# Altium PCB BOARD_2LAYER.PcbDoc (part 7 of 7)
Units mil, origin at the board's own origin, x right, y up, seen from the top; angles counter-clockwise.
Board outline 9842.52 x 9842.52 mil, 2 copper layers (Top Layer, Bottom Layer), stack 34.252 mil thick; 276 components, 129 nets, 793 pads, 303 vias.
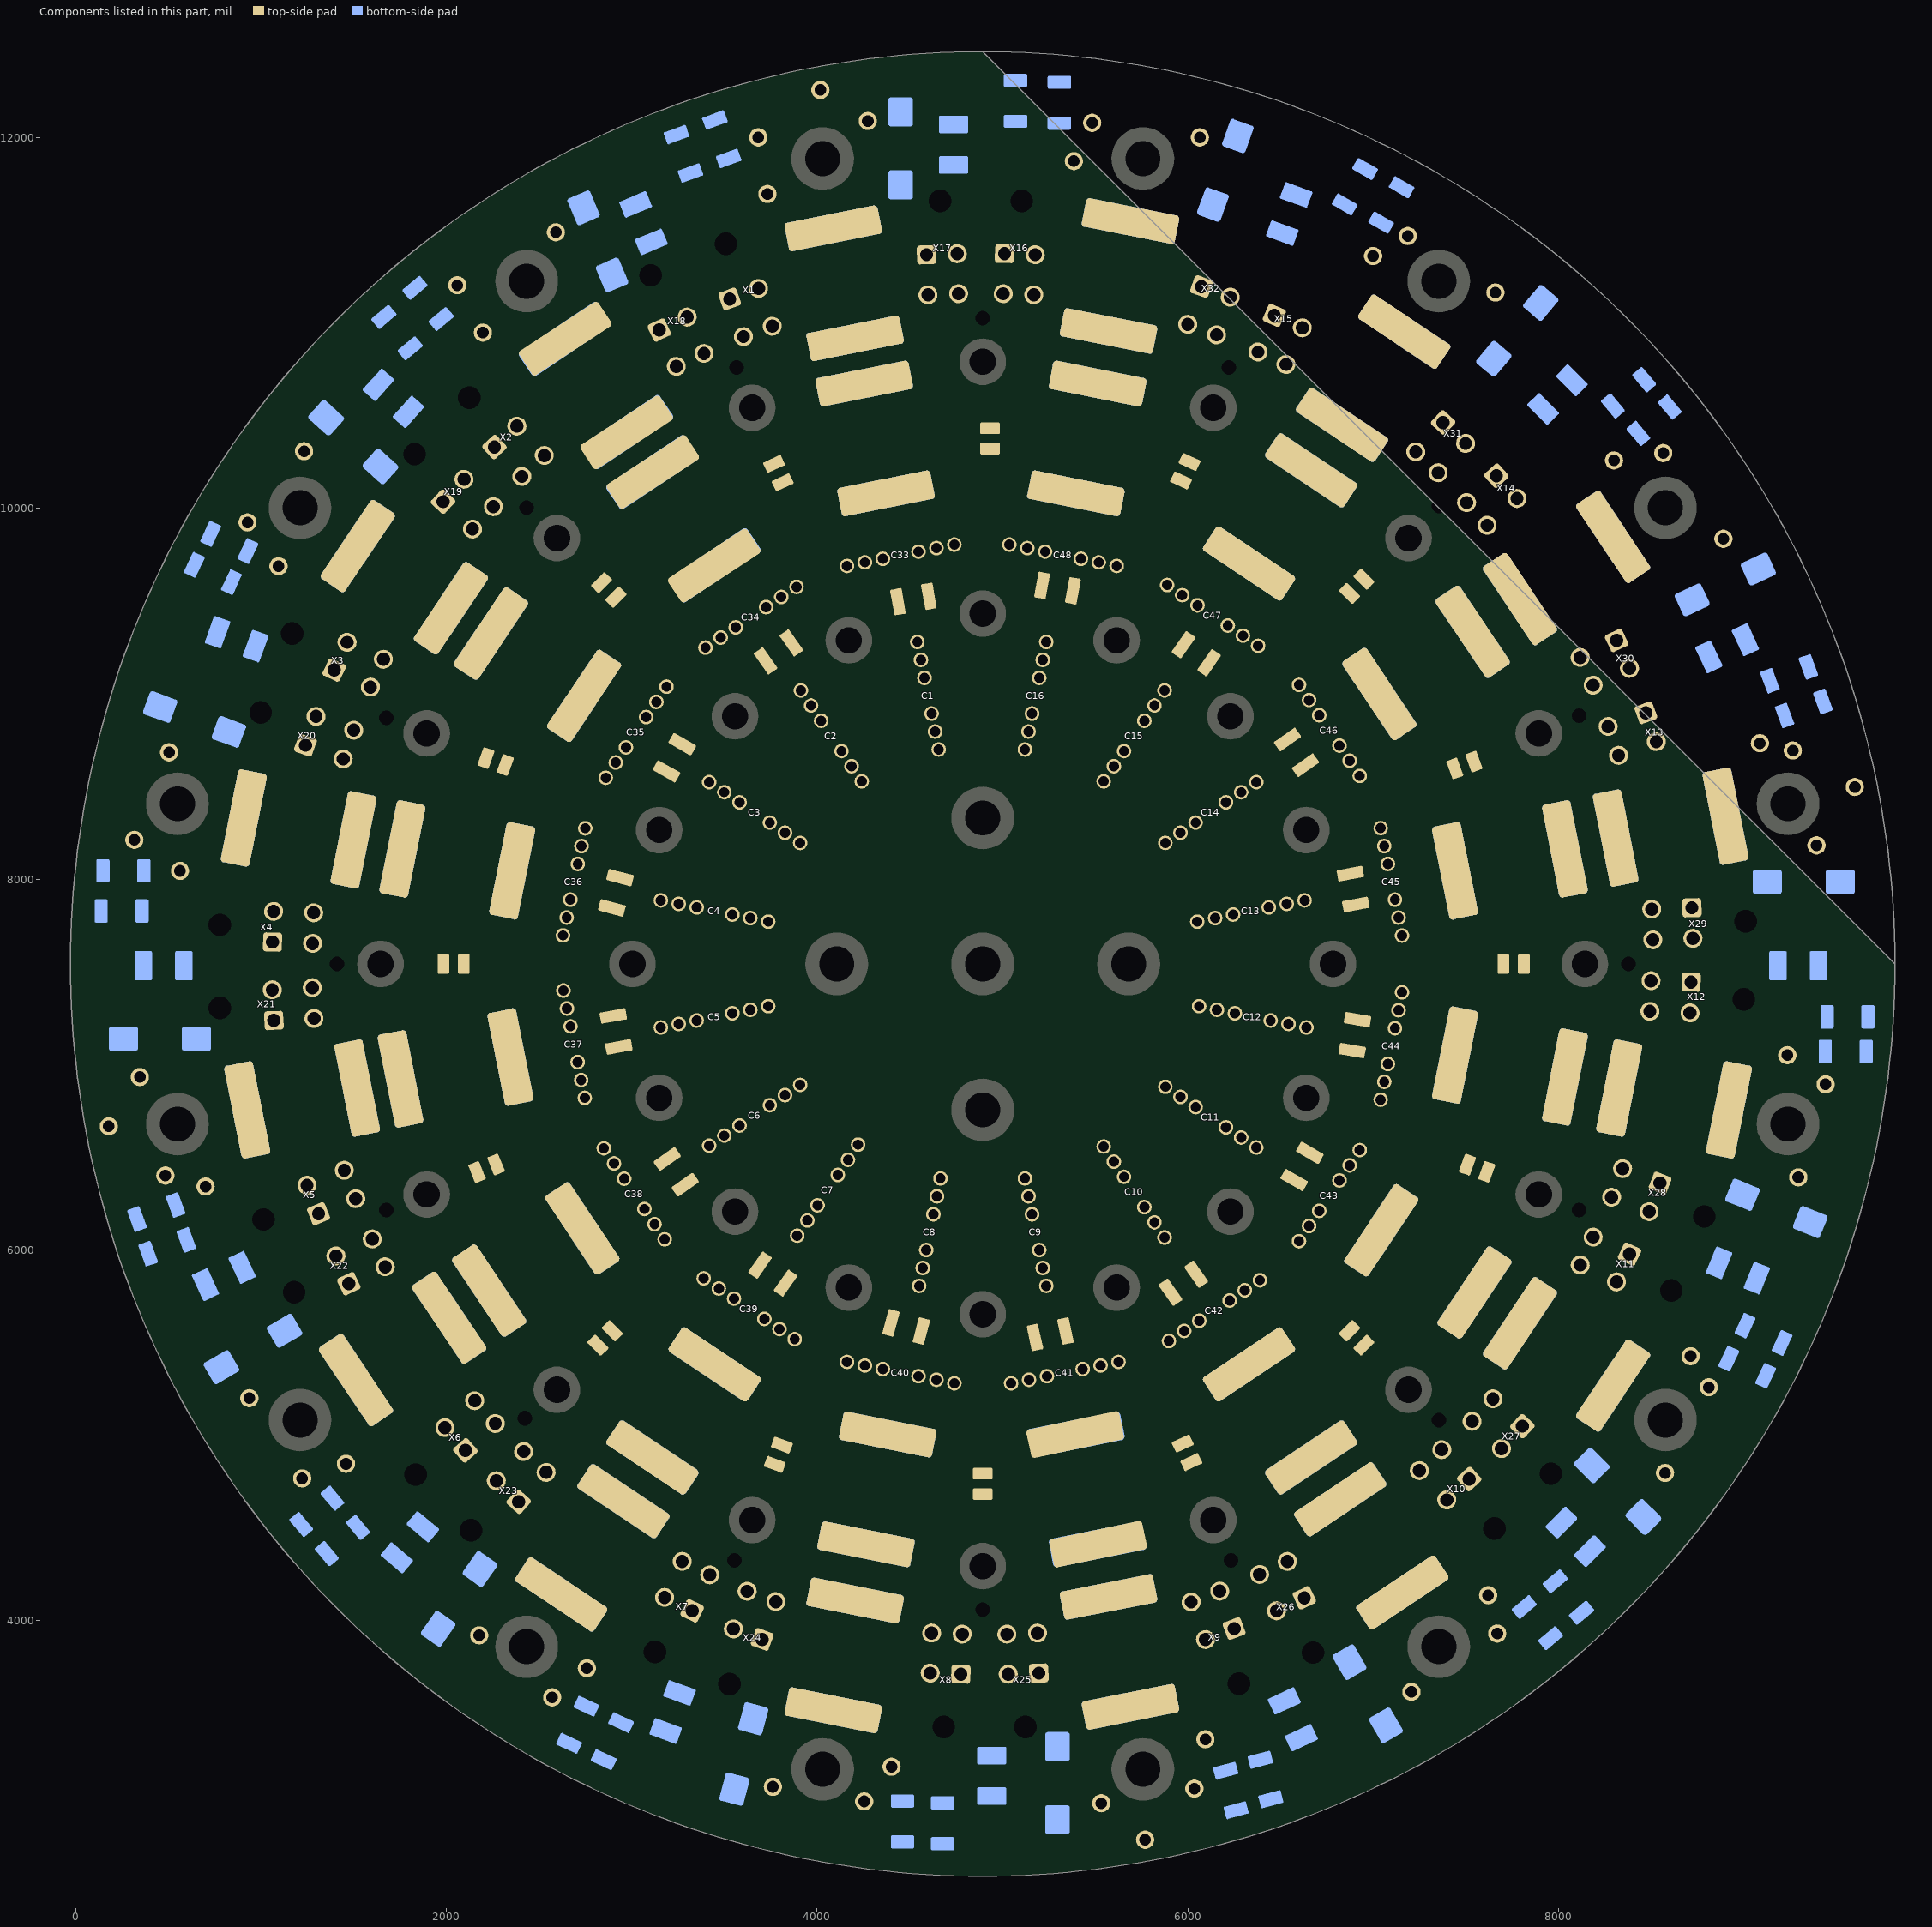
[diagram p7: the components of this part, seen from the top]

## Silkscreen, mask and mechanical layers (free items; w line width, h text height) (continued)
Drill Drawing:
  lines w4.72: 2432.37,807.09 7298.51,807.09 ; 2432.37,996.06 7298.51,996.06 ; 2432.37,3.94 2432.37,1185.04 7298.51,1185.04 7298.51,3.94 2432.37,3.94
  text "A" at 5461.9,12281.5 h78.74
  text "A" at 5518.98,12281.5 h78.74
  text "A" at 5580.01,12281.5 h78.74
  text "A" at 5461.9,12236.22 h78.74
  text "A" at 5518.98,12236.22 h78.74
  text "A" at 5580.01,12236.22 h78.74
  text "C" at 4017.02,12218.5 h78.74
  text "A" at 3591.82,12179.13 h78.74
  text "A" at 3641.03,12179.13 h78.74
  text "A" at 3591.82,12133.86 h78.74
  text "A" at 3641.03,12133.86 h78.74
  text "A" at 3591.82,12080.71 h78.74
  text "A" at 3641.03,12080.71 h78.74
  text "C" at 4272.92,12051.18 h78.74
  text "C" at 5483.55,12041.34 h78.74
  text "C" at 3682.37,11962.6 h78.74
  text "C" at 6064.26,11962.6 h78.74
  text "F" at 4028.83,11848.43 h78.74
  text "F" at 5757.17,11848.43 h78.74
  text "C" at 5385.13,11834.65 h78.74
  text "A" at 7333.94,11659.45 h78.74
  text "A" at 7387.09,11659.45 h78.74
  text "C" at 3731.58,11657.48 h78.74
  text "A" at 7282.76,11657.48 h78.74
  text "H" at 4662.66,11619.84 h78.74
  text "H" at 5103.66,11619.84 h78.74
  text "A" at 7282.76,11616.14 h78.74
  text "A" at 7333.94,11616.14 h78.74
  text "A" at 7387.09,11616.14 h78.74
  text "C" at 2589.85,11450.79 h78.74
  text "C" at 7186.31,11431.1 h78.74
  text "H" at 6248.8,11399.37 h78.74
  text "H" at 3507.67,11389.52 h78.74
  text "D" at 4755.31,11335.5 h78.74
  text "D" at 5011,11335.5 h78.74
  text "A" at 1914.65,11332.68 h78.74
  text "A" at 1961.9,11332.68 h78.74
  text "D" at 4590.06,11329.73 h78.74
  text "D" at 5176.26,11329.73 h78.74
  text "C" at 6999.3,11322.83 h78.74
  text "A" at 1914.65,11289.37 h78.74
  text "A" at 1961.9,11289.37 h78.74
  text "A" at 1914.65,11248.03 h78.74
  text "A" at 1961.9,11248.03 h78.74
  text "H" at 6658.26,11231.54 h78.74
  text "H" at 3101.77,11218.83 h78.74
  text "F" at 2432.37,11187.01 h78.74
  text "F" at 7353.63,11187.01 h78.74
  text "C" at 2058.35,11165.35 h78.74
  text "D" at 6072.81,11157.57 h78.74
  text "D" at 3683.66,11147.73 h78.74
  text "C" at 7658.75,11125.98 h78.74
  text "D" at 4762.87,11119.09 h78.74
  text "D" at 5003.44,11119.09 h78.74
  text "D" at 4597.62,11113.32 h78.74
  text "D" at 5168.7,11113.32 h78.74
  text "D" at 6228.19,11101.02 h78.74
  text "D" at 3528.28,11091.18 h78.74
  text "D" at 6465.84,11002.61 h78.74
  text "D" at 3298.16,10993.3 h78.74
  text "G" at 4893,10988.19 h78.74
  text "D" at 5998.75,10954.1 h78.74
  text "D" at 3757.72,10944.26 h78.74
  text "D" at 6616.9,10935.36 h78.74
  text "D" at 3148.3,10923.42 h78.74
  text "C" at 2196.15,10909.45 h78.74
  text "D" at 6154.13,10897.54 h78.74
  text "D" at 3602.34,10887.7 h78.74
  text "D" at 6377.76,10804.8 h78.74
  text "D" at 3389.67,10797.05 h78.74
  text "E" at 4893,10751.97 h78.74
  text "D" at 6528.82,10737.54 h78.74
  text "D" at 3239.81,10727.17 h78.74
  text "G" at 3564.26,10722.44 h78.74
  text "G" at 6221.74,10722.44 h78.74
  text "H" at 7633.32,10578.74 h78.74
  text "H" at 2123.15,10559.06 h78.74
  text "E" at 3648.91,10503.94 h78.74
  text "E" at 6137.09,10503.94 h78.74
  text "A" at 8715.83,10437.01 h78.74
  text "A" at 8757.17,10437.01 h78.74
  text "D" at 7376.84,10424.94 h78.74
  text "D" at 2379.63,10405.25 h78.74
  text "A" at 8715.83,10389.76 h78.74
  text "A" at 8757.17,10389.76 h78.74
  text "A" at 8715.83,10342.52 h78.74
  text "A" at 8757.17,10342.52 h78.74
  text "D" at 7497.78,10312.17 h78.74
  text "D" at 2258.7,10292.48 h78.74
  text "C" at 1231.58,10269.68 h78.74
  text "H" at 7933.1,10268.69 h78.74
  text "D" at 7229.17,10266.57 h78.74
  text "C" at 8564.26,10259.84 h78.74
  text "H" at 1828.04,10254.1 h78.74
  text "D" at 2527.3,10246.89 h78.74
  text "C" at 8298.51,10220.47 h78.74
  text "D" at 7350.1,10153.8 h78.74
  text "A" at 5180.4,10141.73 h78.74
  text "A" at 4558.35,10137.8 h78.74
  text "D" at 7664.2,10137.82 h78.74
  text "D" at 2406.37,10134.12 h78.74
  text "A" at 5227.65,10131.89 h78.74
  text "A" at 4513.08,10127.95 h78.74
  text "A" at 5272.92,10122.05 h78.74
  text "A" at 4471.74,10120.08 h78.74
  text "D" at 2094.61,10118.56 h78.74
  text "A" at 5316.23,10114.17 h78.74
  text "A" at 4428.43,10112.2 h78.74
  text "A" at 5357.57,10106.3 h78.74
  text "A" at 4387.09,10104.33 h78.74
  text "A" at 5402.84,10096.46 h78.74
  text "A" at 4341.82,10094.49 h78.74
  text "A" at 4300.48,10086.61 h78.74
  text "A" at 5452.05,10086.61 h78.74
  text "A" at 4259.14,10078.74 h78.74
  text "A" at 5497.33,10076.77 h78.74
  text "A" at 4217.8,10070.87 h78.74
  text "A" at 5538.67,10068.9 h78.74
  text "A" at 4174.5,10061.02 h78.74
  text "A" at 5581.98,10061.02 h78.74
  text "A" at 4131.19,10053.15 h78.74
  text "A" at 5629.22,10051.18 h78.74
  text "A" at 767.02,10039.37 h78.74
  text "A" at 822.13,10039.37 h78.74
  text "D" at 7774.84,10014.94 h78.74
  text "D" at 1981.84,9997.62 h78.74
  text "D" at 7503.28,9992.93 h78.74
  text "A" at 767.02,9990.16 h78.74
  text "A" at 822.13,9990.16 h78.74
  text "G" at 7353.63,9974.41 h78.74
  text "D" at 2252.98,9970.88 h78.74
  text "F" at 1209.93,9964.57 h78.74
  text "G" at 2432.37,9964.57 h78.74
  text "F" at 8576.07,9964.57 h78.74
  text "A" at 4446.15,9942.91 h78.74
  text "A" at 767.02,9938.98 h78.74
  text "A" at 822.13,9938.98 h78.74
  text "A" at 5328.04,9937.01 h78.74
  text "A" at 4355.6,9925.2 h78.74
  text "A" at 5408.75,9921.26 h78.74
  text "C" at 926.46,9885.83 h78.74
  text "D" at 7613.93,9870.05 h78.74
  text "D" at 2140.21,9849.95 h78.74
  text "A" at 6168.59,9838.58 h78.74
  text "A" at 3599.69,9812.99 h78.74
  text "A" at 6207.96,9812.99 h78.74
  text "E" at 2595.76,9801.18 h78.74
  text "E" at 7190.24,9801.18 h78.74
  text "C" at 8889.06,9797.24 h78.74
  text "A" at 3564.26,9789.37 h78.74
  text "A" at 6247.33,9787.4 h78.74
  text "A" at 3528.83,9765.75 h78.74
  text "B" at 4739.69,9766.27 h78.74
  text "B" at 5036.47,9766.27 h78.74
  text "A" at 6282.76,9763.78 h78.74
  text "B" at 4643.15,9747.07 h78.74
  text "B" at 5133,9747.07 h78.74
  text "A" at 3491.42,9742.13 h78.74
  text "A" at 6322.13,9736.22 h78.74
  text "B" at 4546.62,9727.86 h78.74
  text "B" at 5229.54,9727.86 h78.74
  text "A" at 3452.05,9716.54 h78.74
  text "A" at 6367.41,9706.69 h78.74
  text "A" at 3414.65,9692.91 h78.74
  text "B" at 4353.55,9689.46 h78.74
  text "B" at 5422.6,9689.46 h78.74
  text "A" at 6408.75,9679.13 h78.74
  text "B" at 4257.02,9670.26 h78.74
  text "B" at 5519.14,9670.26 h78.74
  text "A" at 3377.25,9667.32 h78.74
  text "A" at 6446.15,9653.54 h78.74
  text "B" at 4160.48,9651.06 h78.74
  text "B" at 5615.67,9651.06 h78.74
  text "C" at 1093.79,9649.61 h78.74
  text "A" at 3337.88,9641.73 h78.74
  text "A" at 6483.55,9627.95 h78.74
  text "A" at 3302.45,9620.08 h78.74
  text "A" at 6518.98,9604.33 h78.74
  text "A" at 3263.08,9592.52 h78.74
  text "A" at 6229.61,9592.52 h78.74
  text "A" at 3548.51,9586.61 h78.74
  text "A" at 6554.42,9580.71 h78.74
  text "A" at 3225.68,9568.9 h78.74
  text "B" at 5887.64,9547.9 h78.74
  text "A" at 6298.51,9547.24 h78.74
  text "A" at 3475.68,9541.34 h78.74
  text "B" at 3888.51,9538.06 h78.74
  text "B" at 5969.48,9493.22 h78.74
  text "B" at 3806.67,9483.38 h78.74
  text "B" at 6051.32,9438.54 h78.74
  text "B" at 3724.84,9428.7 h78.74
  text "E" at 4893,9393.7 h78.74
  text "B" at 6214.99,9329.18 h78.74
  text "B" at 3561.16,9319.33 h78.74
  text "H" at 8607.9,9295.17 h78.74
  text "H" at 1168.26,9285.33 h78.74
  text "B" at 6296.83,9274.49 h78.74
  text "B" at 3479.32,9264.65 h78.74
  text "E" at 4170.56,9250 h78.74
  text "E" at 5615.44,9250 h78.74
  text "D" at 8312.48,9248.64 h78.74
  text "B" at 4540.12,9240.39 h78.74
  text "B" at 5236.04,9240.39 h78.74
  text "D" at 1463.67,9238.8 h78.74
  text "B" at 6378.67,9219.81 h78.74
  text "B" at 3397.49,9209.97 h78.74
  text "A" at 6950.09,9179.13 h78.74
  text "D" at 8116.23,9157.13 h78.74
  text "A" at 2818.2,9155.51 h78.74
  text "D" at 1659.92,9147.29 h78.74
  text "B" at 4559.32,9143.86 h78.74
  text "B" at 5216.84,9143.86 h78.74
  text "A" at 6975.68,9139.76 h78.74
  text "A" at 2792.61,9118.11 h78.74
  text "A" at 7001.27,9102.36 h78.74
  text "D" at 8382.36,9098.78 h78.74
  text "D" at 1393.79,9088.94 h78.74
  text "A" at 2770.95,9082.68 h78.74
  text "A" at 7024.89,9066.93 h78.74
  text "A" at 2745.36,9049.21 h78.74
  text "B" at 4578.52,9047.32 h78.74
  text "B" at 5197.63,9047.32 h78.74
  text "A" at 7048.51,9031.5 h78.74
  text "A" at 2723.71,9013.78 h78.74
  text "B" at 6599.03,9009.29 h78.74
  text "D" at 8186.12,9007.27 h78.74
  text "B" at 3186.97,8999.45 h78.74
  text "D" at 1590.04,8997.42 h78.74
  text "A" at 7074.1,8992.13 h78.74
  text "B" at 3912.02,8979.76 h78.74
  text "B" at 5873.98,8979.76 h78.74
  text "A" at 2698.12,8978.35 h78.74
  text "A" at 7097.72,8956.69 h78.74
  text "A" at 2670.56,8937.01 h78.74
  text "B" at 6653.71,8927.45 h78.74
  text "A" at 6918.59,8927.17 h78.74
  text "A" at 2863.47,8921.26 h78.74
  text "A" at 7121.35,8921.26 h78.74
  text "B" at 3132.29,8917.61 h78.74
  text "B" at 3966.71,8897.93 h78.74
  text "B" at 5819.29,8897.93 h78.74
  text "A" at 2643,8895.67 h78.74
  text "A" at 7144.97,8885.83 h78.74
  text "H" at 8768.74,8879.42 h78.74
  text "A" at 6961.9,8868.11 h78.74
  text "H" at 997.57,8859.74 h78.74
  text "A" at 2619.38,8860.24 h78.74
  text "D" at 8470.4,8858.82 h78.74
  text "A" at 2818.2,8854.33 h78.74
  text "B" at 4616.93,8854.25 h78.74
  text "B" at 5159.23,8854.25 h78.74
  text "A" at 7168.59,8850.39 h78.74
  text "B" at 6708.4,8845.62 h78.74
  text "G" at 8111.5,8842.52 h78.74
  text "E" at 3556.39,8840.55 h78.74
  text "E" at 6229.61,8840.55 h78.74
  text "D" at 1295.92,8839.13 h78.74
  text "B" at 3077.6,8835.77 h78.74
  text "G" at 1674.5,8832.68 h78.74
  text "A" at 2597.72,8824.8 h78.74
  text "A" at 9499.3,8822.83 h78.74
  text "A" at 9544.57,8822.83 h78.74
  text "B" at 4021.39,8816.09 h78.74
  text "B" at 5764.61,8816.09 h78.74
  text "A" at 7192.21,8814.96 h78.74
  text "A" at 2572.13,8789.37 h78.74
  text "D" at 8266.92,8784.76 h78.74
  text "A" at 9499.3,8769.68 h78.74
  text "A" at 9544.57,8769.68 h78.74
  text "D" at 1499.39,8765.07 h78.74
  text "B" at 4636.13,8757.72 h78.74
  text "B" at 5140.03,8757.72 h78.74
  text "E" at 1893,8748.03 h78.74
  text "E" at 7893,8748.03 h78.74
  text "A" at 9499.3,8720.47 h78.74
  text "A" at 9544.57,8720.47 h78.74
  text "D" at 8526.95,8703.43 h78.74
  text "C" at 9085.91,8694.88 h78.74
  text "D" at 1239.36,8683.75 h78.74
  text "B" at 6817.76,8681.94 h78.74
  text "B" at 2968.24,8672.1 h78.74
  text "B" at 4655.33,8661.19 h78.74
  text "B" at 5120.83,8661.19 h78.74
  text "C" at 9263.08,8655.51 h78.74
  text "B" at 4130.75,8652.41 h78.74
  text "B" at 5655.25,8652.41 h78.74
  text "C" at 503.24,8645.67 h78.74
  text "D" at 8323.48,8629.37 h78.74
  text "D" at 1442.84,8609.69 h78.74
  text "B" at 6872.44,8600.1 h78.74
  text "B" at 2913.56,8590.26 h78.74
  text "B" at 4185.43,8570.58 h78.74
  text "B" at 5600.56,8570.58 h78.74
  text "B" at 6927.12,8518.27 h78.74
  text "B" at 2858.87,8508.42 h78.74
  text "B" at 4240.12,8488.74 h78.74
  text "B" at 5545.88,8488.74 h78.74
  text "B" at 3417.17,8484.91 h78.74
  text "B" at 6368.83,8484.91 h78.74
  text "C" at 9597.72,8458.66 h78.74
  text "B" at 3499.01,8430.23 h78.74
  text "B" at 6286.99,8430.23 h78.74
  text "B" at 3580.85,8375.55 h78.74
  text "B" at 6205.15,8375.55 h78.74
  text "F" at 548.51,8368.11 h78.74
  text "F" at 9237.49,8368.11 h78.74
  text "F" at 4893,8291.34 h78.74
  text "B" at 3744.52,8266.18 h78.74
  text "B" at 6041.48,8266.18 h78.74
  text "A" at 7450.09,8244.09 h78.74
  text "A" at 2347.72,8238.19 h78.74
  text "B" at 2748.41,8235.94 h78.74
  text "B" at 7040.12,8236.45 h78.74
  text "A" at 103.63,8232.28 h78.74
  text "A" at 148.91,8232.28 h78.74
  text "E" at 3146.94,8226.38 h78.74
  text "E" at 6639.06,8226.38 h78.74
  text "B" at 3826.36,8211.5 h78.74
  text "B" at 5959.64,8211.5 h78.74
  text "A" at 7457.96,8202.76 h78.74
  text "A" at 2337.88,8190.94 h78.74
  text "A" at 103.63,8179.13 h78.74
  text "A" at 148.91,8179.13 h78.74
  text "C" at 316.23,8173.23 h78.74
  text "A" at 7467.8,8161.42 h78.74
  text "B" at 3908.2,8156.82 h78.74
  text "B" at 5877.8,8156.82 h78.74
  text "C" at 9391.03,8143.7 h78.74
  text "A" at 2326.07,8139.76 h78.74
  text "B" at 2728.36,8139.58 h78.74
  text "B" at 7059.32,8139.92 h78.74
  text "A" at 105.6,8127.95 h78.74
  text "A" at 150.87,8127.95 h78.74
  text "A" at 7475.68,8116.14 h78.74
  text "A" at 2318.2,8096.46 h78.74
  text "A" at 7483.55,8074.8 h78.74
  text "A" at 2310.32,8055.12 h78.74
  text "B" at 2708.32,8043.21 h78.74
  text "B" at 7078.52,8043.38 h78.74
  text "A" at 7493.39,8023.62 h78.74
  text "A" at 7322.13,8021.65 h78.74
  text "A" at 2475.68,8019.69 h78.74
  text "A" at 2302.45,8011.81 h78.74
  text "C" at 562.29,8005.91 h78.74
  text "A" at 7503.24,7972.44 h78.74
  text "A" at 2292.61,7964.57 h78.74
  text "A" at 2459.93,7946.85 h78.74
  text "A" at 7341.82,7940.94 h78.74
  text "A" at 7513.08,7927.17 h78.74
  text "A" at 2282.76,7923.23 h78.74
  text "A" at 7522.92,7885.83 h78.74
  text "A" at 2274.89,7881.89 h78.74
  text "B" at 2668.23,7850.49 h78.74
  text "B" at 7116.93,7850.32 h78.74
  text "B" at 3156.55,7846.98 h78.74
  text "B" at 6629.45,7846.98 h78.74
  text "A" at 7530.8,7844.49 h78.74
  text "A" at 2267.02,7840.55 h78.74
  text "B" at 3253.08,7827.77 h78.74
  text "B" at 6532.92,7827.77 h78.74
  text "B" at 3349.62,7808.57 h78.74
  text "B" at 6436.38,7808.57 h78.74
  text "D" at 8718.79,7806.88 h78.74
  text "A" at 7538.67,7799.21 h78.74
  text "D" at 8502.39,7799.32 h78.74
  text "A" at 2257.17,7791.34 h78.74
  text "D" at 1067.21,7787.19 h78.74
  text "D" at 1283.61,7779.64 h78.74
  text "B" at 3542.68,7770.17 h78.74
  text "B" at 6243.32,7770.17 h78.74
  text "B" at 2648.19,7754.12 h78.74
  text "B" at 7136.13,7753.78 h78.74
  text "B" at 3639.22,7750.97 h78.74
  text "B" at 6146.78,7750.97 h78.74
  text "H" at 9008.9,7734.28 h78.74
  text "B" at 3735.75,7731.76 h78.74
  text "B" at 6050.25,7731.76 h78.74
  text "H" at 777.1,7714.6 h78.74
  text "B" at 2628.14,7657.76 h78.74
  text "B" at 7155.33,7657.25 h78.74
  text "D" at 8724.56,7641.62 h78.74
  text "D" at 8508.16,7634.07 h78.74
  text "D" at 1061.44,7621.94 h78.74
  text "D" at 1277.84,7614.38 h78.74
  text "G" at 1408.75,7503.94 h78.74
  text "E" at 1644.97,7503.94 h78.74
  text "E" at 3003.24,7503.94 h78.74
  text "F" at 4105.6,7503.94 h78.74
  text "F" at 4893,7503.94 h78.74
  text "F" at 5680.4,7503.94 h78.74
  text "E" at 6782.76,7503.94 h78.74
  text "E" at 8141.03,7503.94 h78.74
  text "G" at 8377.25,7503.94 h78.74
  text "D" at 8498.31,7413.18 h78.74
  text "D" at 8714.72,7405.62 h78.74
  text "D" at 1276.32,7375.63 h78.74
  text "D" at 1060.08,7364.3 h78.74
  text "B" at 2630.67,7360.47 h78.74
  text "B" at 7155.33,7350.63 h78.74
  text "H" at 8999.06,7312.96 h78.74
  text "B" at 3735.75,7276.11 h78.74
  text "B" at 6060.09,7276.11 h78.74
  text "H" at 777.4,7266.69 h78.74
  text "B" at 2649.87,7263.93 h78.74
  text "B" at 3639.22,7256.91 h78.74
  text "B" at 6156.62,7256.91 h78.74
  text "B" at 7136.13,7254.09 h78.74
  text "D" at 8492.54,7247.92 h78.74
  text "D" at 8708.95,7240.37 h78.74
  text "B" at 3542.68,7237.71 h78.74
  text "B" at 6253.16,7237.71 h78.74
  text "A" at 7538.67,7226.38 h78.74
  text "A" at 2251.27,7214.57 h78.74
  text "D" at 1284.97,7210.5 h78.74
  text "D" at 1068.73,7199.17 h78.74
  text "B" at 3349.62,7199.3 h78.74
  text "B" at 6446.23,7199.3 h78.74
  text "A" at 7530.8,7185.04 h78.74
  text "B" at 3253.08,7180.1 h78.74
  text "B" at 6542.76,7180.1 h78.74
  text "A" at 2261.11,7171.26 h78.74
  text "B" at 2669.07,7167.4 h78.74
  text "B" at 3156.55,7160.9 h78.74
  text "B" at 6639.29,7160.9 h78.74
  text "B" at 7116.93,7157.56 h78.74
  text "A" at 7522.92,7143.7 h78.74
  text "A" at 2268.98,7125.98 h78.74
  text "A" at 7515.05,7102.36 h78.74
  text "A" at 2278.83,7080.71 h78.74
  text "A" at 2454.02,7061.02 h78.74
  text "A" at 7505.2,7061.02 h78.74
  text "A" at 7328.23,7051.96 h78.74
  text "A" at 2288.67,7031.5 h78.74
  text "A" at 7497.33,7013.78 h78.74
  text "C" at 9233.55,7011.81 h78.74
  text "A" at 7320.17,7007.87 h78.74
  text "A" at 2471.74,6994.09 h78.74
  text "A" at 2298.51,6984.25 h78.74
  text "B" at 2707.48,6974.33 h78.74
  text "A" at 7487.49,6970.47 h78.74
  text "B" at 7078.52,6964.49 h78.74
  text "A" at 2306.39,6942.91 h78.74
  text "A" at 7479.61,6925.2 h78.74
  text "A" at 2314.26,6901.57 h78.74
  text "C" at 345.76,6893.7 h78.74
  text "A" at 9605.6,6893.7 h78.74
  text "A" at 9652.84,6893.7 h78.74
  text "B" at 2726.68,6877.8 h78.74
  text "A" at 7467.8,6872.05 h78.74
  text "B" at 7059.32,6867.96 h78.74
  text "A" at 2324.1,6860.24 h78.74
  text "C" at 9440.24,6854.33 h78.74
  text "B" at 3908.2,6851.05 h78.74
  text "B" at 5877.8,6841.21 h78.74
  text "A" at 9605.6,6838.58 h78.74
  text "A" at 9652.84,6838.58 h78.74
  text "A" at 7457.96,6824.8 h78.74
  text "A" at 2331.98,6818.9 h78.74
  text "B" at 3826.36,6796.37 h78.74
  text "B" at 5959.64,6786.53 h78.74
  text "B" at 2745.88,6781.26 h78.74
  text "E" at 3146.94,6781.5 h78.74
  text "E" at 6639.06,6781.5 h78.74
  text "A" at 7450.09,6781.5 h78.74
  text "A" at 9605.6,6779.53 h78.74
  text "A" at 9652.84,6779.53 h78.74
  text "A" at 2339.85,6773.62 h78.74
  text "B" at 7040.12,6771.42 h78.74
  text "B" at 3744.52,6741.69 h78.74
  text "B" at 6041.48,6731.85 h78.74
  text "F" at 4893,6716.54 h78.74
  text "F" at 548.51,6639.76 h78.74
  text "F" at 9237.49,6639.76 h78.74
  text "B" at 3580.85,6632.33 h78.74
  text "C" at 178.43,6627.95 h78.74
  text "B" at 6205.15,6622.48 h78.74
  text "B" at 3499.01,6577.64 h78.74
  text "B" at 6286.99,6567.8 h78.74
  text "B" at 4220.43,6528.98 h78.74
  text "B" at 3417.17,6522.96 h78.74
  text "B" at 5545.88,6519.13 h78.74
  text "B" at 6368.83,6513.12 h78.74
  text "B" at 2849.03,6509.29 h78.74
  text "B" at 6927.12,6499.45 h78.74
  text "B" at 4165.75,6447.14 h78.74
  text "B" at 5600.56,6437.3 h78.74
  text "B" at 2903.71,6427.45 h78.74
  text "B" at 6872.44,6417.61 h78.74
  text "D" at 8345.17,6399.45 h78.74
  text "D" at 1448.63,6390.84 h78.74
  text "B" at 4111.07,6365.3 h78.74
  text "C" at 483.55,6362.2 h78.74
  text "B" at 5655.25,6355.46 h78.74
  text "C" at 9292.61,6352.36 h78.74
  text "A" at 204.02,6350.39 h78.74
  text "A" at 247.33,6350.39 h78.74
  text "B" at 4665.17,6346.69 h78.74
  text "B" at 5120.83,6346.69 h78.74
  text "B" at 2958.4,6345.62 h78.74
  text "B" at 6817.76,6335.77 h78.74
  text "D" at 8547.33,6321.85 h78.74
  text "D" at 1247.86,6309.72 h78.74
  text "A" at 247.33,6303.15 h78.74
  text "C" at 700.09,6303.15 h78.74
  text "A" at 204.02,6301.18 h78.74
  text "E" at 1893,6259.84 h78.74
  text "E" at 7893,6259.84 h78.74
  text "A" at 205.99,6251.97 h78.74
  text "A" at 247.33,6251.97 h78.74
  text "B" at 4645.97,6250.15 h78.74
  text "B" at 5140.03,6250.15 h78.74
  text "D" at 8285.92,6245.08 h78.74
  text "D" at 1510.58,6237.52 h78.74
  text "A" at 7215.83,6228.35 h78.74
  text "A" at 2572.13,6226.38 h78.74
  text "B" at 4001.7,6201.63 h78.74
  text "A" at 7194.18,6192.91 h78.74
  text "B" at 5764.61,6191.78 h78.74
  text "A" at 2595.76,6188.98 h78.74
  text "B" at 3067.76,6181.94 h78.74
  text "G" at 1674.5,6175.2 h78.74
  text "G" at 8111.5,6175.2 h78.74
  text "B" at 6708.4,6172.1 h78.74
  text "E" at 3556.39,6167.32 h78.74
  text "E" at 6229.61,6167.32 h78.74
  text "D" at 8488.07,6167.48 h78.74
  text "A" at 6975.68,6159.45 h78.74
  text "A" at 2817.38,6156.78 h78.74
  text "A" at 7168.59,6157.48 h78.74
  text "D" at 1309.81,6156.41 h78.74
  text "B" at 4626.77,6153.62 h78.74
  text "B" at 5159.23,6153.62 h78.74
  text "A" at 2621.35,6151.57 h78.74
  text "H" at 8786.01,6141.67 h78.74
  text "H" at 1012.36,6125.4 h78.74
  text "A" at 7146.94,6122.05 h78.74
  text "B" at 3947.02,6119.79 h78.74
  text "A" at 2644.97,6114.17 h78.74
  text "A" at 2849.69,6112.2 h78.74
  text "B" at 5819.29,6109.95 h78.74
  text "B" at 3122.44,6100.1 h78.74
  text "A" at 6930.4,6096.46 h78.74
  text "B" at 6653.71,6090.26 h78.74
  text "A" at 7117.41,6078.74 h78.74
  text "A" at 2672.53,6074.8 h78.74
  text "A" at 2696.15,6039.37 h78.74
  text "B" at 3892.34,6037.95 h78.74
  text "A" at 7087.88,6037.4 h78.74
  text "D" at 8186.12,6030.14 h78.74
  text "B" at 5873.98,6028.11 h78.74
  text "D" at 1599.88,6020.29 h78.74
  text "B" at 3177.12,6018.27 h78.74
  text "B" at 6599.03,6008.42 h78.74
  text "A" at 2719.77,6003.94 h78.74
  text "A" at 7066.23,6001.97 h78.74
  text "A" at 2743.39,5968.5 h78.74
  text "A" at 7042.61,5966.54 h78.74
  text "B" at 4588.36,5960.55 h78.74
  text "B" at 5197.63,5960.55 h78.74
  text "D" at 8382.36,5938.62 h78.74
  text "A" at 2768.98,5931.1 h78.74
  text "A" at 7018.98,5931.1 h78.74
  text "D" at 1403.64,5928.78 h78.74
  text "A" at 2792.61,5893.7 h78.74
  text "A" at 6991.42,5891.73 h78.74
  text "D" at 8116.23,5880.27 h78.74
  text "D" at 1669.77,5870.43 h78.74
  text "B" at 4569.16,5864.02 h78.74
  text "B" at 5216.84,5864.02 h78.74
  text "A" at 2816.23,5858.27 h78.74
  text "A" at 6965.83,5852.36 h78.74
  text "B" at 3387.64,5807.75 h78.74
  text "B" at 6388.51,5797.9 h78.74
  text "D" at 8312.48,5788.76 h78.74
  text "D" at 1473.52,5778.92 h78.74
  text "B" at 4549.96,5767.48 h78.74
  text "B" at 5236.04,5767.48 h78.74
  text "E" at 4170.56,5757.87 h78.74
  text "E" at 5615.44,5757.87 h78.74
  text "B" at 3469.48,5753.06 h78.74
  text "B" at 6306.67,5743.22 h78.74
  text "H" at 8607.9,5742.23 h78.74
  text "H" at 1178.1,5732.39 h78.74
  text "B" at 3551.32,5698.38 h78.74
  text "B" at 6224.84,5688.54 h78.74
  text "E" at 4893,5614.17 h78.74
  text "B" at 3714.99,5589.02 h78.74
  text "B" at 6061.16,5579.18 h78.74
  text "B" at 3796.83,5534.34 h78.74
  text "B" at 5979.32,5524.49 h78.74
  text "B" at 3878.67,5479.65 h78.74
  text "B" at 5897.49,5469.81 h78.74
  text "A" at 6296.54,5456.69 h78.74
  text "A" at 3493.39,5452.76 h78.74
  text "A" at 3243.39,5427.17 h78.74
  text "A" at 6544.57,5425.2 h78.74
  text "A" at 3534.73,5423.23 h78.74
  text "A" at 6235.52,5419.29 h78.74
  text "A" at 6509.14,5401.57 h78.74
  text "A" at 3290.64,5397.64 h78.74
  text "C" at 8711.9,5387.8 h78.74
  text "A" at 6471.74,5375.98 h78.74
  text "A" at 3331.98,5372.05 h78.74
  text "B" at 4160.48,5356.82 h78.74
  text "B" at 5625.52,5356.82 h78.74
  text "A" at 6436.31,5354.33 h78.74
  text "A" at 3369.38,5344.49 h78.74
  text "B" at 4257.02,5337.62 h78.74
  text "B" at 5528.98,5337.62 h78.74
  text "A" at 6402.84,5328.74 h78.74
  text "A" at 3406.78,5320.87 h78.74
  text "B" at 4353.55,5318.41 h78.74
  text "B" at 5432.45,5318.41 h78.74
  text "A" at 6363.47,5305.12 h78.74
  text "A" at 3452.05,5289.37 h78.74
  text "A" at 6328.04,5281.5 h78.74
  text "B" at 4546.62,5280.01 h78.74
  text "B" at 5239.38,5280.01 h78.74
  text "B" at 4643.15,5260.81 h78.74
  text "B" at 5142.85,5260.81 h78.74
  text "A" at 3495.36,5259.84 h78.74
  text "A" at 6292.61,5255.91 h78.74
  text "B" at 4739.69,5241.61 h78.74
  text "B" at 5046.31,5241.61 h78.74
  text "A" at 6255.2,5232.28 h78.74
  text "A" at 3540.64,5230.31 h78.74
  text "C" at 8810.32,5220.47 h78.74
  text "A" at 6219.77,5208.66 h78.74
  text "E" at 2595.76,5206.69 h78.74
  text "A" at 3576.07,5206.69 h78.74
  text "E" at 7190.24,5206.69 h78.74
  text "A" at 6180.4,5181.1 h78.74
  text "A" at 3615.44,5179.13 h78.74
  text "C" at 936.31,5161.42 h78.74
  text "D" at 7645.79,5157.93 h78.74
  text "A" at 9017.02,5149.61 h78.74
  text "A" at 9066.23,5149.61 h78.74
  text "D" at 2152.39,5147.67 h78.74
  text "A" at 9017.02,5096.46 h78.74
  text "A" at 9066.23,5096.46 h78.74
  text "A" at 4371.35,5080.71 h78.74
  text "A" at 5404.81,5080.71 h78.74
  text "A" at 4442.21,5066.93 h78.74
  text "A" at 5328.04,5064.96 h78.74
  text "G" at 2422.53,5053.15 h78.74
  text "F" at 1209.93,5043.31 h78.74
  text "G" at 7353.63,5043.31 h78.74
  text "F" at 8576.07,5043.31 h78.74
  text "A" at 9017.02,5043.31 h78.74
  text "A" at 9066.23,5043.31 h78.74
  text "D" at 7533.02,5036.99 h78.74
  text "D" at 2263.03,5024.78 h78.74
  text "D" at 7804.16,5010.25 h78.74
  text "D" at 1991.47,5002.78 h78.74
  text "A" at 4148.91,4960.63 h78.74
  text "A" at 5633.16,4958.66 h78.74
  text "A" at 4192.21,4952.76 h78.74
  text "A" at 5589.85,4952.76 h78.74
  text "A" at 4235.52,4942.91 h78.74
  text "A" at 5540.64,4940.94 h78.74
  text "A" at 4282.76,4933.07 h78.74
  text "A" at 5497.33,4933.07 h78.74
  text "A" at 4328.04,4925.2 h78.74
  text "A" at 5452.05,4923.23 h78.74
  text "A" at 4373.31,4915.35 h78.74
  text "A" at 5410.72,4913.39 h78.74
  text "A" at 4416.62,4907.48 h78.74
  text "A" at 5367.41,4905.51 h78.74
  text "A" at 4465.83,4897.64 h78.74
  text "A" at 5316.23,4895.67 h78.74
  text "A" at 4507.17,4889.76 h78.74
  text "D" at 7691.39,4889.32 h78.74
  text "A" at 5270.95,4885.83 h78.74
  text "D" at 7369.78,4883.6 h78.74
  text "D" at 2102.11,4879.89 h78.74
  text "A" at 4556.39,4879.92 h78.74
  text "A" at 5229.61,4877.95 h78.74
  text "D" at 2416.21,4873.76 h78.74
  text "A" at 4599.69,4872.05 h78.74
  text "A" at 5174.5,4866.14 h78.74
  text "C" at 1457.96,4807.09 h78.74
  text "D" at 7248.85,4770.83 h78.74
  text "D" at 2537.15,4760.99 h78.74
  text "C" at 8574.1,4757.87 h78.74
  text "H" at 7957.96,4753.78 h78.74
  text "H" at 1833.21,4749.03 h78.74
  text "C" at 1221.74,4728.35 h78.74
  text "D" at 7517.46,4725.24 h78.74
  text "D" at 2268.54,4715.39 h78.74
  text "A" at 1026.86,4692.91 h78.74
  text "A" at 1074.1,4692.91 h78.74
  text "A" at 1026.86,4645.67 h78.74
  text "A" at 1074.1,4645.67 h78.74
  text "D" at 7396.53,4612.46 h78.74
  text "D" at 2389.47,4602.62 h78.74
  text "A" at 1026.86,4596.46 h78.74
  text "A" at 1074.1,4594.49 h78.74
  text "E" at 3648.91,4503.94 h78.74
  text "E" at 6137.09,4503.94 h78.74
  text "H" at 7653,4458.66 h78.74
  text "H" at 2133,4448.81 h78.74
  text "G" at 3554.42,4285.43 h78.74
  text "G" at 6231.58,4285.43 h78.74
  text "D" at 3271.66,4281.19 h78.74
  text "D" at 6536.35,4280.7 h78.74
  text "E" at 4893,4255.91 h78.74
  text "D" at 6386.49,4210.82 h78.74
  text "D" at 3420.28,4208.7 h78.74
  text "D" at 6171.54,4120.86 h78.74
  text "D" at 3622.02,4120.17 h78.74
  text "C" at 7619.38,4098.43 h78.74
  text "D" at 3176.74,4086.57 h78.74
  text "D" at 6627.86,4084.45 h78.74
  text "D" at 3777.41,4063.62 h78.74
  text "D" at 6017.17,4061.61 h78.74
  text "G" at 4893,4019.68 h78.74
  text "D" at 6478,4014.57 h78.74
  text "D" at 3325.36,4014.08 h78.74
  text "D" at 6249.14,3918.71 h78.74
  text "D" at 3547.96,3916.7 h78.74
  text "D" at 4617.3,3894.55 h78.74
  text "D" at 5188.38,3894.55 h78.74
  text "C" at 7668.59,3891.73 h78.74
  text "D" at 4782.55,3888.78 h78.74
  text "D" at 5023.13,3888.78 h78.74
  text "C" at 2176.46,3881.89 h78.74
  text "D" at 3703.35,3860.14 h78.74
  text "D" at 6094.77,3859.45 h78.74
  text "F" at 2432.37,3820.87 h78.74
  text "F" at 7353.63,3820.87 h78.74
  text "H" at 3125.06,3792.01 h78.74
  text "H" at 6674.39,3789.04 h78.74
  text "A" at 7788.67,3734.25 h78.74
  text "A" at 7835.91,3734.25 h78.74
  text "A" at 7883.16,3734.25 h78.74
  text "C" at 2757.17,3704.72 h78.74
  text "A" at 7788.67,3688.98 h78.74
  text "A" at 7835.91,3688.98 h78.74
  text "A" at 7883.16,3688.98 h78.74
  text "D" at 4609.74,3678.15 h78.74
  text "D" at 5195.94,3678.15 h78.74
  text "D" at 4775,3672.38 h78.74
  text "D" at 5030.69,3672.38 h78.74
  text "H" at 6274.95,3620.77 h78.74
  text "H" at 3527.36,3618.35 h78.74
  text "C" at 7205.99,3576.77 h78.74
  text "C" at 2570.17,3547.24 h78.74
  text "A" at 2391.03,3438.98 h78.74
  text "A" at 2450.09,3438.98 h78.74
  text "A" at 2450.09,3395.67 h78.74
  text "A" at 2391.03,3393.7 h78.74
  text "H" at 4682.34,3388.04 h78.74
  text "H" at 5123.34,3388.04 h78.74
  text "A" at 2391.03,3346.46 h78.74
  text "A" at 2450.09,3346.46 h78.74
  text "C" at 6093.79,3320.87 h78.74
  text "C" at 4400.87,3173.23 h78.74
  text "F" at 4028.83,3159.45 h78.74
  text "F" at 5757.17,3159.45 h78.74
  text "C" at 3761.11,3064.96 h78.74
  text "C" at 6034.73,3055.12 h78.74
  text "C" at 4253.24,2986.22 h78.74
  text "C" at 5532.76,2976.38 h78.74
  text "A" at 5989.46,2879.92 h78.74
  text "A" at 6040.64,2879.92 h78.74
  text "A" at 6089.85,2879.92 h78.74
  text "A" at 6089.85,2836.61 h78.74
  text "A" at 5989.46,2834.65 h78.74
  text "A" at 6040.64,2834.65 h78.74
  text "A" at 4066.23,2799.21 h78.74
  text "A" at 4125.28,2799.21 h78.74
  text "A" at 4184.34,2799.21 h78.74
  text "C" at 5768.98,2779.53 h78.74
  text "A" at 4066.23,2751.97 h78.74
  text "A" at 4125.28,2751.97 h78.74
  text "A" at 4182.37,2751.97 h78.74
  text "Through Holes" at 4611.89,1066.93 h47.24
  text "Symbol" at 2550.22,877.95 h47.24
  text "Diameter" at 3212.96,877.95 h47.24
  text "Tolerance" at 4086.25,877.95 h47.24
  text "Plated" at 4818.12,877.95 h47.24
  text "Punched" at 5313.44,877.95 h47.24
  text "HoleName" at 6046.7,877.95 h47.24
  text "Quantity" at 6850.84,877.95 h47.24
  text "A" at 2668.59,736.22 h47.24
  text "0.5000" at 3261.63,736.22 h47.24
  text "Yes" at 4887.81,736.22 h47.24
  text "No" at 5431.34,736.22 h47.24
  text "Rnd 0,5" at 6077.79,736.22 h47.24
  text "303" at 6966.52,736.22 h47.24
  text "B" at 2668.59,641.73 h47.24
  text "1.4000" at 3262.35,641.73 h47.24
  text "Yes" at 4887.81,641.73 h47.24
  text "No" at 5431.34,641.73 h47.24
  text "Rnd 1.4" at 6078.6,641.73 h47.24
  text "192" at 6967.09,641.73 h47.24
  text "C" at 2668.59,547.24 h47.24
  text "1.6000" at 3262.35,547.24 h47.24
  text "Yes" at 4887.81,547.24 h47.24
  text "No" at 5431.34,547.24 h47.24
  text "Rnd 1,6" at 6078.53,547.24 h47.24
  text "52" at 6990.37,547.24 h47.24
  text "D" at 2668.59,452.76 h47.24
  text "1.8000" at 3262.54,452.76 h47.24
  text "Yes" at 4887.81,452.76 h47.24
  text "No" at 5431.34,452.76 h47.24
  text "Rnd 1,8" at 6078.73,452.76 h47.24
  text "128" at 6967.24,452.76 h47.24
  text "E" at 2668.59,358.27 h47.24
  text "3.6000" at 3261.63,358.27 h47.24
  text "Yes" at 4887.81,358.27 h47.24
  text "No" at 5431.34,358.27 h47.24
  text "Rnd 3,6" at 6077.79,358.27 h47.24
  text "32" at 6990.37,358.27 h47.24
  text "F" at 2668.59,263.78 h47.24
  text "4.8000" at 3261.81,263.78 h47.24
  text "Yes" at 4887.81,263.78 h47.24
  text "No" at 5431.34,263.78 h47.24
  text "Rnd 4.8" at 6078.05,263.78 h47.24
  text "21" at 6990.8,263.78 h47.24
  text "G" at 2668.59,169.29 h47.24
  text "2.0000" at 3261.63,169.29 h47.24
  text "No" at 4911.65,169.29 h47.24
  text "No" at 5431.34,169.29 h47.24
  text "Rnd 2 Non-Plated" at 5870.96,169.29 h47.24
  text "16" at 6990.8,169.29 h47.24
  text "H" at 2668.59,74.8 h47.24
  text "3.1000" at 3262.35,74.8 h47.24
  text "No" at 4911.65,74.8 h47.24
  text "No" at 5431.34,74.8 h47.24
  text "Rnd 3,1 Non-Plated" at 5829.04,74.8 h47.24
  text "32" at 6990.37,74.8 h47.24